# Allegro board REF_038XS-SI6D5018Q-A100.brd

Outline 581.66 x 429.26 mm; copper layers: TOP, L02_GND, L03_DPS, L04_GND, L05_DPS, L06_GND, L07_DPS, L08_GND, L09_DPS, L10_GND, L11_DPS, L12_GND, L13_SIGNAL, L14_GND, L15_SIGNAL, L16_GND, L17_SIGNAL, L18_GND, L19_SIGNAL, L20_GND, L21_SIGNAL, L22_GND, L23_SIGNAL, L24_GND, L25_SIGNAL, L26_GND, L27_SIGNAL, L28_GND, L29_SIGNAL, L30_GND, L31_SIGNAL, L32_GND, L33_SIGNAL, L34_GND, L35_DPS, L36_UDB, L37_GND, BOTTOM. Coordinates in mm from the lower left corner of the outline.

## Design rules (mm)
net group D231_MCB1_E: nets D231_MCB1_E+ D231_MCB1_E-
net group D231_MCB1_EE: nets D231_MCB1_EE+ D231_MCB1_EE-
net group D231_MCB1_F: nets D231_MCB1_F+ D231_MCB1_F-
net group D231_MCB1_FF: nets D231_MCB1_FF+ D231_MCB1_FF-
net group D231_MCB1_G: nets D231_MCB1_G+ D231_MCB1_G-
net group D231_MCB1_GG: nets D231_MCB1_GG+ D231_MCB1_GG-
net group D231_MCB1_H: nets D231_MCB1_H+ D231_MCB1_H-
net group D231_MCB1_HH: nets D231_MCB1_HH+ D231_MCB1_HH-
net group D232_MCB1_E: nets D232_MCB1_E+ D232_MCB1_E-
net group D232_MCB1_EE: nets D232_MCB1_EE+ D232_MCB1_EE-
net group D232_MCB1_F: nets D232_MCB1_F+ D232_MCB1_F-
net group D232_MCB1_FF: nets D232_MCB1_FF+ D232_MCB1_FF-
net group D232_MCB1_G: nets D232_MCB1_G+ D232_MCB1_G-
net group D232_MCB1_GG: nets D232_MCB1_GG+ D232_MCB1_GG-
net group D232_MCB1_H: nets D232_MCB1_H+ D232_MCB1_H-
net group D232_MCB1_HH: nets D232_MCB1_HH+ D232_MCB1_HH-
net group D431_MCB1_AA: nets D431_MCB1_AA+ D431_MCB1_AA-
net group D431_MCB1_BB: nets D431_MCB1_BB+ D431_MCB1_BB-
net group D431_MCB1_CC: nets D431_MCB1_CC+ D431_MCB1_CC-
net group D431_MCB1_DD: nets D431_MCB1_DD+ D431_MCB1_DD-
net group D432_MCB1_A: nets D432_MCB1_A+ D432_MCB1_A-
net group D432_MCB1_AA: nets D432_MCB1_AA+ D432_MCB1_AA-
net group D432_MCB1_B: nets D432_MCB1_B+ D432_MCB1_B-
net group D432_MCB1_BB: nets D432_MCB1_BB+ D432_MCB1_BB-
net group D432_MCB1_C: nets D432_MCB1_C+ D432_MCB1_C-
net group D432_MCB1_CC: nets D432_MCB1_CC+ D432_MCB1_CC-
net group D432_MCB1_D: nets D432_MCB1_D+ D432_MCB1_D-
net group D432_MCB1_DD: nets D432_MCB1_DD+ D432_MCB1_DD-
net group DIFFPAIR900: nets D21401 D21403
net group DIFFPAIR904: nets D10601 D10603
net group AWG: nets S1_AWG_2SHARE+ S1_AWG_2SHARE- S2_AWG_2SHARE+ S2_AWG_2SHARE- S3_AWG_2SHARE+ S3_AWG_2SHARE- S4_AWG_2SHARE+ S4_AWG_2SHARE- S5_AWG_2SHARE+ S5_AWG_2SHARE- S6_AWG_2SHARE+ S6_AWG_2SHARE- S7_AWG_2SHARE+ S7_AWG_2SHARE- S8_AWG_2SHARE+ S8_AWG_2SHARE-
net group ETH-1: nets D10907 D10909 D10912 D10914 D11307 D11309 D11312 D11314 D11708 D11710 D11711 D11713 D12108 D12110 D12111 D12113
net group ETH-2: nets D10905 D10910 D10911 D10916 D11305 D11310 D11311 D11316 D11706 D11709 D11712 D11715 D12106 D12109 D12112 D12115
net group ETH-3: nets D10906 D10908 D10913 D10915 D11306 D11308 D11313 D11315 D11705 D11707 D11714 D11716 D12105 D12107 D12114 D12116
net group MIPI1: nets D21601 D21603 D21901 D21903 D22109 D22111
net group MIPI2: nets D21602 D21604 D21902 D21904 D22110 D22112
net group MIPI3: nets D21605 D21607 D21905 D21907 D22113 D22115
net group MIPI4: nets D21606 D21608 D21906 D21908 D22114 D22116
net group MIPI5: nets D10801 D10803 D12009 D12011 D12901 D12903
net group MIPI6: nets D10802 D10804 D12010 D12012 D12902 D12904
net group MIPI7: nets D10805 D10807 D12013 D12015 D12905 D12907
net group MIPI8: nets D10806 D10808 D12014 D12016 D12906 D12908
net group MIPI SWITCH: nets S1_OUT_RX0_CH0_ABC_CASE+ S1_OUT_RX0_CH0_ABC_CASE- S1_OUT_RX0_CH1_ABC_CASE+ S1_OUT_RX0_CH1_ABC_CASE- S1_OUT_RX0_CH2_ABC_CASE+ S1_OUT_RX0_CH2_ABC_CASE-
net group MIPI SWITCH1: nets S2_OUT_RX0_CH0_ABC_CASE+ S2_OUT_RX0_CH0_ABC_CASE- S2_OUT_RX0_CH1_ABC_CASE+ S2_OUT_RX0_CH1_ABC_CASE- S2_OUT_RX0_CH2_ABC_CASE+ S2_OUT_RX0_CH2_ABC_CASE- S3_OUT_RX0_CH0_ABC_CASE+ S3_OUT_RX0_CH0_ABC_CASE- S3_OUT_RX0_CH1_ABC_CASE+ S3_OUT_RX0_CH1_ABC_CASE- S3_OUT_RX0_CH2_ABC_CASE+ S3_OUT_RX0_CH2_ABC_CASE- S4_OUT_RX0_CH0_ABC_CASE+ S4_OUT_RX0_CH0_ABC_CASE- S4_OUT_RX0_CH1_ABC_CASE+ S4_OUT_RX0_CH1_ABC_CASE- S4_OUT_RX0_CH2_ABC_CASE+ S4_OUT_RX0_CH2_ABC_CASE- S5_OUT_RX0_CH0_ABC_CASE+ S5_OUT_RX0_CH0_ABC_CASE- S5_OUT_RX0_CH1_ABC_CASE+ S5_OUT_RX0_CH1_ABC_CASE- S5_OUT_RX0_CH2_ABC_CASE+ S5_OUT_RX0_CH2_ABC_CASE- S6_OUT_RX0_CH0_ABC_CASE+ S6_OUT_RX0_CH0_ABC_CASE- S6_OUT_RX0_CH1_ABC_CASE+ S6_OUT_RX0_CH1_ABC_CASE- S6_OUT_RX0_CH2_ABC_CASE+ S6_OUT_RX0_CH2_ABC_CASE- S7_OUT_RX0_CH0_ABC_CASE+ S7_OUT_RX0_CH0_ABC_CASE- S7_OUT_RX0_CH1_ABC_CASE+ S7_OUT_RX0_CH1_ABC_CASE- S7_OUT_RX0_CH2_ABC_CASE+ S7_OUT_RX0_CH2_ABC_CASE- S8_OUT_RX0_CH0_ABC_CASE+ S8_OUT_RX0_CH0_ABC_CASE- S8_OUT_RX0_CH1_ABC_CASE+ S8_OUT_RX0_CH1_ABC_CASE- S8_OUT_RX0_CH2_ABC_CASE+ S8_OUT_RX0_CH2_ABC_CASE-

## Placement (name value [footprint] x y rotation side)
2SA1  SHORT  [DEFAULT_SHORT_SMALL]  265.71 251.64 180 top
2SA2  SHORT  [DEFAULT_SHORT_SMALL]  265.71 252.15 180 top
2SA7  SHORT  [DEFAULT_SHORT_SMALL]  264.03 245.86 90 top
2SA8  SHORT  [DEFAULT_SHORT_SMALL]  265.3 245.86 90 top
2SA9  SHORT  [DEFAULT_SHORT_SMALL]  266.07 238 180 top
2SA10  SHORT  [DEFAULT_SHORT_SMALL]  266.07 237.49 180 top
2SA15  SHORT  [DEFAULT_SHORT_SMALL]  277.49 250.16 90 top
2SA16  SHORT  [DEFAULT_SHORT_SMALL]  276.98 250.16 90 top
2SA17  SHORT  [DEFAULT_SHORT_SMALL]  273.21 238.53 0 top
2SA18  SHORT  [DEFAULT_SHORT_SMALL]  273.21 237.92 0 top
2SA19  SHORT  [DEFAULT_SHORT_SMALL]  264.08 243.68 270 top
2SA20  SHORT  [DEFAULT_SHORT_SMALL]  263.49 243.68 270 top
2SA21  SHORT  [DEFAULT_SHORT_SMALL]  279.27 250.18 90 top
2SA22  SHORT  [DEFAULT_SHORT_SMALL]  280.54 250.2 90 top
2SA23  SHORT  [DEFAULT_SHORT_SMALL]  273.41 237.52 270 top
2SA24  SHORT  [DEFAULT_SHORT_SMALL]  274.06 237.52 270 top
3SA1  SHORT  [DEFAULT_SHORT_SMALL]  305.71 251.64 180 top
3SA2  SHORT  [DEFAULT_SHORT_SMALL]  305.71 252.15 180 top
3SA7  SHORT  [DEFAULT_SHORT_SMALL]  304.03 245.86 90 top
3SA8  SHORT  [DEFAULT_SHORT_SMALL]  305.3 245.86 90 top
3SA9  SHORT  [DEFAULT_SHORT_SMALL]  306.07 238 180 top
3SA10  SHORT  [DEFAULT_SHORT_SMALL]  306.07 237.49 180 top
3SA15  SHORT  [DEFAULT_SHORT_SMALL]  317.49 250.16 90 top
3SA16  SHORT  [DEFAULT_SHORT_SMALL]  316.98 250.16 90 top
3SA17  SHORT  [DEFAULT_SHORT_SMALL]  313.21 238.53 0 top
3SA18  SHORT  [DEFAULT_SHORT_SMALL]  313.21 237.92 0 top
3SA19  SHORT  [DEFAULT_SHORT_SMALL]  304.08 243.68 270 top
3SA20  SHORT  [DEFAULT_SHORT_SMALL]  303.49 243.68 270 top
3SA21  SHORT  [DEFAULT_SHORT_SMALL]  319.27 250.18 90 top
3SA22  SHORT  [DEFAULT_SHORT_SMALL]  320.54 250.2 90 top
3SA23  SHORT  [DEFAULT_SHORT_SMALL]  313.41 237.52 270 top
3SA24  SHORT  [DEFAULT_SHORT_SMALL]  314.06 237.52 270 top
4SA1  SHORT  [DEFAULT_SHORT_SMALL]  345.71 251.64 180 top
4SA2  SHORT  [DEFAULT_SHORT_SMALL]  345.71 252.15 180 top
4SA7  SHORT  [DEFAULT_SHORT_SMALL]  344.03 245.86 90 top
4SA8  SHORT  [DEFAULT_SHORT_SMALL]  345.3 245.86 90 top
4SA9  SHORT  [DEFAULT_SHORT_SMALL]  346.07 238 180 top
4SA10  SHORT  [DEFAULT_SHORT_SMALL]  346.07 237.49 180 top
4SA15  SHORT  [DEFAULT_SHORT_SMALL]  357.49 250.16 90 top
4SA16  SHORT  [DEFAULT_SHORT_SMALL]  356.98 250.16 90 top
4SA17  SHORT  [DEFAULT_SHORT_SMALL]  353.21 238.53 0 top
4SA18  SHORT  [DEFAULT_SHORT_SMALL]  353.21 237.92 0 top
4SA19  SHORT  [DEFAULT_SHORT_SMALL]  344.08 243.68 270 top
4SA20  SHORT  [DEFAULT_SHORT_SMALL]  343.49 243.68 270 top
4SA21  SHORT  [DEFAULT_SHORT_SMALL]  359.27 250.18 90 top
4SA22  SHORT  [DEFAULT_SHORT_SMALL]  360.54 250.2 90 top
4SA23  SHORT  [DEFAULT_SHORT_SMALL]  353.41 237.52 270 top
4SA24  SHORT  [DEFAULT_SHORT_SMALL]  354.06 237.52 270 top
5SA1  SHORT  [DEFAULT_SHORT_SMALL]  236.06 191.36 0 top
5SA2  SHORT  [DEFAULT_SHORT_SMALL]  236.06 191.87 0 top
5SA7  SHORT  [DEFAULT_SHORT_SMALL]  223.4 185.16 90 top
5SA8  SHORT  [DEFAULT_SHORT_SMALL]  223.91 185.16 90 top
5SA9  SHORT  [DEFAULT_SHORT_SMALL]  234.24 174.5 270 top
5SA10  SHORT  [DEFAULT_SHORT_SMALL]  235.03 174.5 270 top
5SA15  SHORT  [DEFAULT_SHORT_SMALL]  239.49 193.83 90 top
5SA16  SHORT  [DEFAULT_SHORT_SMALL]  238.98 193.83 90 top
5SA17  SHORT  [DEFAULT_SHORT_SMALL]  235.98 191.77 0 top
5SA18  SHORT  [DEFAULT_SHORT_SMALL]  235.98 192.46 0 top
5SA19  SHORT  [DEFAULT_SHORT_SMALL]  224.08 183.68 270 top
5SA20  SHORT  [DEFAULT_SHORT_SMALL]  223.49 183.68 270 top
5SA21  SHORT  [DEFAULT_SHORT_SMALL]  234.54 193.95 0 top
5SA22  SHORT  [DEFAULT_SHORT_SMALL]  234.54 195.43 0 top
5SA23  SHORT  [DEFAULT_SHORT_SMALL]  233.04 174.51 270 top
5SA24  SHORT  [DEFAULT_SHORT_SMALL]  234.32 174.51 270 top
6SA1  SHORT  [DEFAULT_SHORT_SMALL]  276.06 191.36 0 top
6SA2  SHORT  [DEFAULT_SHORT_SMALL]  276.06 191.87 0 top
6SA7  SHORT  [DEFAULT_SHORT_SMALL]  263.4 185.16 90 top
6SA8  SHORT  [DEFAULT_SHORT_SMALL]  263.91 185.16 90 top
6SA9  SHORT  [DEFAULT_SHORT_SMALL]  274.24 174.5 270 top
6SA10  SHORT  [DEFAULT_SHORT_SMALL]  275.03 174.5 270 top
6SA15  SHORT  [DEFAULT_SHORT_SMALL]  279.49 193.83 90 top
6SA16  SHORT  [DEFAULT_SHORT_SMALL]  278.98 193.83 90 top
6SA17  SHORT  [DEFAULT_SHORT_SMALL]  275.98 191.77 0 top
6SA18  SHORT  [DEFAULT_SHORT_SMALL]  275.98 192.46 0 top
6SA19  SHORT  [DEFAULT_SHORT_SMALL]  264.08 183.68 270 top
6SA20  SHORT  [DEFAULT_SHORT_SMALL]  263.49 183.68 270 top
6SA21  SHORT  [DEFAULT_SHORT_SMALL]  274.54 193.95 0 top
6SA22  SHORT  [DEFAULT_SHORT_SMALL]  274.54 195.43 0 top
6SA23  SHORT  [DEFAULT_SHORT_SMALL]  273.04 174.51 270 top
6SA24  SHORT  [DEFAULT_SHORT_SMALL]  274.32 174.51 270 top
7SA1  SHORT  [DEFAULT_SHORT_SMALL]  316.06 191.36 0 top
7SA2  SHORT  [DEFAULT_SHORT_SMALL]  316.06 191.87 0 top
7SA7  SHORT  [DEFAULT_SHORT_SMALL]  303.4 185.16 90 top
7SA8  SHORT  [DEFAULT_SHORT_SMALL]  303.91 185.16 90 top
7SA9  SHORT  [DEFAULT_SHORT_SMALL]  314.24 174.5 270 top
7SA10  SHORT  [DEFAULT_SHORT_SMALL]  315.03 174.5 270 top
7SA15  SHORT  [DEFAULT_SHORT_SMALL]  319.49 193.83 90 top
7SA16  SHORT  [DEFAULT_SHORT_SMALL]  318.98 193.83 90 top
7SA17  SHORT  [DEFAULT_SHORT_SMALL]  315.98 191.77 0 top
7SA18  SHORT  [DEFAULT_SHORT_SMALL]  315.98 192.46 0 top
7SA19  SHORT  [DEFAULT_SHORT_SMALL]  304.08 183.68 270 top
7SA20  SHORT  [DEFAULT_SHORT_SMALL]  303.49 183.68 270 top
7SA21  SHORT  [DEFAULT_SHORT_SMALL]  314.54 193.95 0 top
7SA22  SHORT  [DEFAULT_SHORT_SMALL]  314.54 195.43 0 top
7SA23  SHORT  [DEFAULT_SHORT_SMALL]  313.04 174.51 270 top
7SA24  SHORT  [DEFAULT_SHORT_SMALL]  314.32 174.51 270 top
8SA1  SHORT  [DEFAULT_SHORT_SMALL]  356.06 191.36 0 top
8SA2  SHORT  [DEFAULT_SHORT_SMALL]  356.06 191.87 0 top
8SA7  SHORT  [DEFAULT_SHORT_SMALL]  343.4 185.16 90 top
8SA8  SHORT  [DEFAULT_SHORT_SMALL]  343.91 185.16 90 top
8SA9  SHORT  [DEFAULT_SHORT_SMALL]  354.24 174.5 270 top
8SA10  SHORT  [DEFAULT_SHORT_SMALL]  355.03 174.5 270 top
8SA15  SHORT  [DEFAULT_SHORT_SMALL]  359.49 193.83 90 top
8SA16  SHORT  [DEFAULT_SHORT_SMALL]  358.98 193.83 90 top
8SA17  SHORT  [DEFAULT_SHORT_SMALL]  355.98 191.77 0 top
8SA18  SHORT  [DEFAULT_SHORT_SMALL]  355.98 192.46 0 top
8SA19  SHORT  [DEFAULT_SHORT_SMALL]  344.08 183.68 270 top
8SA20  SHORT  [DEFAULT_SHORT_SMALL]  343.49 183.68 270 top
8SA21  SHORT  [DEFAULT_SHORT_SMALL]  354.54 193.95 0 top
8SA22  SHORT  [DEFAULT_SHORT_SMALL]  354.54 195.43 0 top
8SA23  SHORT  [DEFAULT_SHORT_SMALL]  353.04 174.51 270 top
8SA24  SHORT  [DEFAULT_SHORT_SMALL]  354.32 174.51 270 top
BD5  BD120-1.5A-S4-MU  [FB0402]  543.47 239.79 270 bottom
BD9  BD120-1.5A-S4-MU  [FB0402]  224.66 243.83 270 bottom
BD21  BD120-1.5A-S4-MU  [FB0402]  222.95 232.36 0 bottom
BD1721  BD120-1.5A-S4-MU  [FB0402]  543.47 226.84 270 bottom
BD1722  BD120-1.5A-S4-MU  [FB0402]  543.09 213.5 270 bottom
BD1723  BD120-1.5A-S4-MU  [FB0402]  543.09 199.41 270 bottom
BD1728  BD120-1.5A-S4-MU  [FB0402]  229.83 271.82 270 bottom
BD1729  BD120-1.5A-S4-MU  [FB0402]  236.97 270.94 270 bottom
BDB5  BD120-1.5A-S4-MU  [FB0402]  211.03 246.46 0 bottom
BDB6  BD120-1.5A-S4-MU  [FB0402]  211.03 234.89 0 bottom
BGA234-11X11-P0.65  REF-CODE-SOCKET  [SOCKET_CODE]  3.67 430.51 0 top
C262  0.1U-16-X7S-S2-MU  [C0201]  224.41 232.06 270 bottom
C264  NC/10U-16-X7R-S8-SS  [C0805]  227.48 269.95 90 bottom
C267  33P-50-N-S2-MU  [C0201]  236.23 224.18 270 bottom
C268  33P-50-N-S2-MU  [C0201]  235.23 224.18 270 bottom
C270  NC/10U-16-X7R-S8-SS  [C0805]  224.95 259 0 bottom
C271  12P-50-N-S4-MU  [C0402]  232.95 267.19 180 bottom
C272  12P-50-N-S4-MU  [C0402]  230.93 267.19 0 bottom
C278  1U-10-X7S-S4-TDK  [C0402]  232.87 289.3 0 bottom
C279  1U-10-X7S-S4-TDK  [C0402]  232.87 288.11 0 bottom
C280  0.1U-16-X-S4-MU  [C0402]  232.87 286.91 0 bottom
C281  0.1U-16-X-S4-MU  [C0402]  232.87 285.72 0 bottom
C282  1U-10-X7S-S4-TDK  [C0402]  238.7 282.67 270 bottom
C283  0.1U-16-X-S4-MU  [C0402]  237.54 282.67 270 bottom
C284  1U-10-X7S-S4-TDK  [C0402]  237.62 294.04 90 bottom
C285  0.1U-16-X-S4-MU  [C0402]  238.81 294.04 90 bottom
C286  0.1U-16-X-S4-MU  [C0402]  233.82 293.54 180 bottom
C288  1000P-50-X7R-S2-MU  [C0201]  233.49 291.76 270 bottom
C289  0.1U-16-X-S4-MU  [C0402]  231.21 291 270 bottom
C290  NC/0.1U-16-X7R-S4-TY  [C0402]  224.35 292.22 180 bottom
C298  0.1U-16-X7S-S2-MU  [C0201]  222.95 288.84 90 bottom
C299  0.1U-16-X7S-S2-MU  [C0201]  220.02 293.16 180 bottom
C300  0.1U-16-X-S4-MU  [C0402]  220.67 287.06 270 bottom
C301  1U-10-X7S-S4-TDK  [C0402]  219.51 287.06 270 bottom
C302  10P-50-N-S2-MU  [C0201]  214.98 243.61 0 bottom
C309  10P-50-N-S2-MU  [C0201]  214.98 255.18 0 bottom
C310  10P-50-N-S2-MU  [C0201]  213.69 255.18 180 bottom
C318  10P-50-N-S2-MU  [C0201]  211.94 255.18 0 bottom
C320  10P-50-N-S2-MU  [C0201]  213.69 243.61 180 bottom
C332  2.2U-16-X7R-S6-TY  [C0603]  109.1 226.65 270 bottom
C333  0.1U-16-X-S4-MU  [C0402]  107.7 226.83 270 bottom
C334  10U-16-X7R-S8-SS  [C0805]  100.08 226.53 90 bottom
C335  0.1U-16-X-S4-MU  [C0402]  101.74 226.35 90 bottom
C336  4.7U-25-X7R-S8-TY  [C0805]  87.58 240.29 270 bottom
C337  0.1U-16-X-S4-MU  [C0402]  87.6 237.74 180 bottom
C338  4.7U-25-X7R-S8-TY  [C0805]  106 240.29 270 bottom
C339  0.1U-16-X-S4-MU  [C0402]  106.03 237.74 180 bottom
C400  2.2U-10-X-S4-MU  [C0402]  540.94 239.82 90 bottom
C401  0.1U-16-X-S4-MU  [C0402]  542.2 239.82 90 bottom
C402  4.7U-6.3-X-S4-MU  [C0402]  523.51 152.12 0 bottom
C403  22U-16-X5R-SA-SS  [C1206]  520.12 149.58 90 bottom
C404  10U-25-X-S6-MU  [C0603]  519.86 146.58 180 bottom
C405  1U-10-X7S-S4-TDK  [C0402]  520.37 145.26 180 bottom
C406  0.1U-16-X-S4-MU  [C0402]  90.42 287.53 180 bottom
C407  2.2U-10-X-S4-MU  [C0402]  82.6 288.09 270 bottom
C408  0.1U-16-X-S4-MU  [C0402]  83.74 288.09 270 bottom
C409  0.1U-16-X-S4-MU  [C0402]  73.71 296.14 0 bottom
C410  0.1U-16-X-S4-MU  [C0402]  503.58 221.92 270 bottom
C411  0.1U-16-X-S4-MU  [C0402]  493.55 229.97 0 bottom
C412  2.2U-10-X-S4-MU  [C0402]  502.43 221.92 270 bottom
C413  0.1U-16-X-S4-MU  [C0402]  510.25 221.35 180 bottom
C415  0.1U-16-X-S4-MU  [C0402]  90.42 273.81 180 bottom
C416  2.2U-10-X-S4-MU  [C0402]  82.6 274.38 270 bottom
C417  0.1U-16-X-S4-MU  [C0402]  73.71 282.43 0 bottom
C475  4.7U-6.3-X-S4-MU  [C0402]  225.86 265.11 270 bottom
C476  1U-10-X7S-S4-TDK  [C0402]  219 268.25 90 bottom
C477  10U-25-X-S6-MU  [C0603]  220.32 268.76 90 bottom
C478  22U-16-X5R-SA-SS  [C1206]  223.32 268.5 0 bottom
C894  0.1U-16-X-S4-MU  [C0402]  542.2 226.87 90 bottom
C895  2.2U-10-X-S4-MU  [C0402]  540.94 226.87 90 bottom
C910  0.1U-16-X-S4-MU  [C0402]  83.74 274.38 270 bottom
C922  0.1U-16-X-S4-MU  [C0402]  213.16 246.46 0 bottom
C923  0.1U-16-X-S4-MU  [C0402]  213.16 234.89 0 bottom
C924  10P-50-N-S2-MU  [C0201]  211.94 243.61 0 bottom
C955  0.1U-16-X-S4-MU  [C0402]  90.42 260.1 180 bottom
C956  2.2U-10-X-S4-MU  [C0402]  82.6 260.66 270 bottom
C957  0.1U-16-X-S4-MU  [C0402]  73.71 268.71 0 bottom
C958  0.1U-16-X-S4-MU  [C0402]  83.74 260.66 270 bottom
C983  0.1U-16-X-S4-MU  [C0402]  541.82 213.53 90 bottom
C984  2.2U-10-X-S4-MU  [C0402]  540.55 213.53 90 bottom
C985  0.1U-16-X-S4-MU  [C0402]  541.82 199.44 90 bottom
C986  2.2U-10-X-S4-MU  [C0402]  540.55 199.44 90 bottom
C1066  0.01U-10-X7R-S2-YA  [C0201]  244.98 274.19 0 bottom
C1067  0.01U-10-X7R-S2-YA  [C0201]  246.33 274.19 180 bottom
C1074  0.1U-16-X7S-S2-MU  [C0201_MINI]  229.58 270.27 180 bottom
C1077  0.1U-16-X7S-S2-MU  [C0201_MINI]  236.72 269.49 180 bottom
C1080  0.1U-16-X7S-S2-MU  [C0201_MINI]  242.99 269.49 180 bottom
C1081  0.1U-16-X7S-S2-MU  [C0201_MINI]  243.8 273.3 180 bottom
C1082  0.1U-16-X-S4-MU  [C0402]  503.58 203.76 270 bottom
C1083  0.1U-16-X-S4-MU  [C0402]  248.15 224.79 0 bottom
C1085  2.2U-10-X-S4-MU  [C0402]  493.55 211.81 0 bottom
CA1  0.1U-16-X-S4-MU  [C0402]  205.72 237.49 0 bottom
CA2  10U-25-X7R-SA  [C1206]  205.72 240.03 0 bottom
CA7  10U-25-X7R-SA  [C1206]  245.12 281.69 0 bottom
CA8  0.1U-16-X-S4-MU  [C0402]  245.12 279.65 0 bottom
CA19  470U-25-E-S10.4X10.4  [EC_10P3X10_S]  189.66 230.89 90 bottom
CA20  10U-25-X7R-SA  [C1206]  216.67 281.69 0 bottom
CA21  0.1U-16-X-S4-MU  [C0402]  216.67 279.65 0 bottom
CA22  10U-25-X7R-SA  [C1206]  222.76 277.62 0 bottom
CA23  0.1U-16-X-S4-MU  [C0402]  222.76 275.59 0 bottom
CA24  10U-25-X7R-SA  [C1206]  216.67 277.62 0 bottom
CA25  0.1U-16-X-S4-MU  [C0402]  216.67 275.59 0 bottom
CA26  10U-25-X7R-SA  [C1206]  235.18 277.62 0 bottom
CA27  0.1U-16-X-S4-MU  [C0402]  235.18 275.59 0 bottom
CA34  10U-25-X7R-SA  [C1206]  245.12 277.62 0 bottom
CA35  0.1U-16-X-S4-MU  [C0402]  245.12 275.59 0 bottom
CA36  0.1U-16-X-S4-MU  [C0402]  228.85 275.59 0 bottom
CA37  10U-25-X7R-SA  [C1206]  228.85 277.62 0 bottom
CB1  0.1U-25-X-S6  [C0603]  416.81 133.35 0 bottom
CB2  10U-25-X7R-SA  [C1206]  416.81 130.81 0 bottom
CB3  0.1U-25-X-S6  [C0603]  560.07 133.35 0 bottom
CB4  10U-25-X7R-SA  [C1206]  560.07 130.81 0 bottom
CB5  0.1U-25-X-S6  [C0603]  560.07 295.91 180 bottom
CB6  10U-25-X7R-SA  [C1206]  560.07 298.45 180 bottom
CB7  0.1U-25-X-S6  [C0603]  424.16 290.83 180 bottom
CB8  10U-25-X7R-SA  [C1206]  424.16 293.37 180 bottom
CB9  0.1U-25-X-S6  [C0603]  164.85 133.35 0 bottom
CB10  10U-25-X7R-SA  [C1206]  164.85 130.81 0 bottom
CB11  0.1U-25-X-S6  [C0603]  157.46 290.83 180 bottom
CB12  10U-25-X7R-SA  [C1206]  157.46 293.37 180 bottom
CB13  0.1U-25-X-S6  [C0603]  21.59 133.35 0 bottom
CB14  10U-25-X7R-SA  [C1206]  21.59 130.81 0 bottom
CB15  0.1U-25-X-S6  [C0603]  21.59 295.91 180 bottom
CB16  10U-25-X7R-SA  [C1206]  21.59 298.45 180 bottom
CC1  0.1U-16-X7S-S2-MU  [C0201]  230.19 246.91 180 bottom
CC2  0.1U-16-X7S-S2-MU  [C0201]  230.5 250.48 90 bottom
CC3  0.1U-16-X7S-S2-MU  [C0201]  228.87 245.61 180 bottom
CC4  0.1U-16-X7S-S2-MU  [C0201]  230.19 246.26 180 bottom
CC5  0.1U-16-X7S-S2-MU  [C0201]  231.16 246.56 90 bottom
CC6  0.1U-16-X7S-S2-MU  [C0201]  228.87 244.96 180 bottom
CC7  0.1U-16-X7S-S2-MU  [C0201]  232.14 244.96 0 bottom
CC8  0.1U-16-X7S-S2-MU  [C0201]  230.5 243.97 270 bottom
CC9  0.1U-16-X7S-S2-MU  [C0201]  231.16 243.97 270 bottom
CC12  0.1U-16-X7S-S2-MU  [C0201]  229.86 244.62 270 bottom
CC13  0.1U-16-X7S-S2-MU  [C0201]  228.24 241.05 180 bottom
CC14  0.1U-16-X7S-S2-MU  [C0201]  231.46 245.61 0 bottom
CC15  0.1U-16-X7S-S2-MU  [C0201]  230.19 245.61 180 bottom
CC16  0.1U-16-X7S-S2-MU  [C0201]  230.84 244.96 180 bottom
CC70  0.1U-16-X7S-S2-MU  [C0201]  232.46 242.67 270 bottom
CC71  0.1U-16-X7S-S2-MU  [C0201]  235.38 243 0 bottom
CC73  0.1U-16-X7S-S2-MU  [C0201]  227.91 242.68 90 bottom
CC84  0.1U-16-X7S-S2-MU  [C0201]  233.11 250.48 90 bottom
CC85  0.1U-16-X7S-S2-MU  [C0201]  231.15 250.48 90 bottom
CC86  0.1U-16-X7S-S2-MU  [C0201]  232.46 250.48 90 bottom
CC87  0.1U-16-X7S-S2-MU  [C0201]  232.14 246.26 180 bottom
CC88  0.1U-16-X7S-S2-MU  [C0201]  233.11 244 270 bottom
CC89  0.1U-16-X7S-S2-MU  [C0201]  227.91 244.66 270 bottom
CC90  0.1U-16-X7S-S2-MU  [C0201]  231.8 250.48 90 bottom
CC91  0.1U-16-X7S-S2-MU  [C0201]  234.06 243.65 0 bottom
CC92  0.1U-16-X7S-S2-MU  [C0201]  232.45 244 270 bottom
CC96  0.1U-16-X7S-S2-MU  [C0201]  231.51 247.56 180 bottom
CC101  0.1U-16-X7S-S2-MU  [C0201]  230.84 240.4 0 bottom
CC103  0.1U-16-X7S-S2-MU  [C0201]  231.81 242.02 90 bottom
CC105  0.1U-16-X7S-S2-MU  [C0201]  232.46 240.72 270 bottom
CC107  0.1U-16-X7S-S2-MU  [C0201]  232.76 241.7 0 bottom
CC112  0.1U-16-X7S-S2-MU  [C0201]  235.06 250.48 90 bottom
CC130  0.1U-16-X7S-S2-MU  [C0201]  228.24 241.7 180 bottom
CC133  1U-6.3-X7T-S2-MU  [C0201]  227.26 238.78 270 bottom
CC134  NC/0.1U-10-X7R-S2-MU  [C0201]  227.91 238.78 270 bottom
CC182  0.1U-16-X7S-S2-MU  [C0201]  226.61 250.48 90 bottom
CC194  0.1U-16-X7S-S2-MU  [C0201]  231.49 243 180 bottom
CC202  0.1U-16-X7S-S2-MU  [C0201]  226.28 245.61 180 bottom
CC203  0.1U-16-X7S-S2-MU  [C0201]  229.86 239.42 270 bottom
CC204  0.1U-16-X7S-S2-MU  [C0201]  230.51 239.42 270 bottom
CC205  0.1U-16-X7S-S2-MU  [C0201]  231.16 239.42 270 bottom
CC208  0.1U-16-X7S-S2-MU  [C0201]  227.57 246.26 180 bottom
CC209  0.1U-16-X7S-S2-MU  [C0201]  228.23 247.56 180 bottom
CC210  0.1U-16-X7S-S2-MU  [C0201]  229.53 240.41 180 bottom
CC211  0.1U-16-X7S-S2-MU  [C0201]  230.5 242.02 90 bottom
CC212  0.1U-16-X7S-S2-MU  [C0201]  229.53 241.06 180 bottom
CC213  0.1U-16-X7S-S2-MU  [C0201]  231.16 242.02 90 bottom
CC215  0.1U-16-X7S-S2-MU  [C0201]  231.81 239.42 90 bottom
CC216  0.1U-16-X7S-S2-MU  [C0201]  228.56 238.78 270 bottom
CD1  0.1U-16-X7S-S2-MU  [C0201]  295.73 296.3 90 top
CD2  0.1U-16-X7S-S2-MU  [C0201]  465.17 278.08 90 top
CON1  MS-PWR-CONN-30P-V3-SI6D70  [CONN_15X2_100MIL_PH_MS_V2]  24.74 150.36 90 top
CSDPS303  V93K_CSDPS_DPS32  [PG_VG93K_PF_DPS32_G1D303]  327.66 46.99 0 top
CSDPS307  V93K_CSDPS_DPS32  [PG_VG93K_PF_DPS32_G1D307]  401.32 46.99 0 top
CSDPS310  V93K_CSDPS_DPS32  [PG_VG93K_PF_DPS32_G2D310]  401.32 361.95 0 top
CSDPS314  V93K_CSDPS_DPS32  [PG_VG93K_PF_DPS32_G2D314]  327.66 361.95 0 top
CSDPS319  V93K_CSDPS_DPS32  [PG_VG93K_PF_DPS32_G3D319]  180.34 46.99 0 top
CSDPS323  V93K_CSDPS_DPS32  [PG_VG93K_PF_DPS32_G3D323]  254 46.99 0 top
CSDPS426  V93K_CSDPS  [PG_VG93K_PF_DPS32_G8D426]  254 361.95 0 top
CSDPS430  V93K_CSDPS  [PG_VG93K_PF_DPS32_G8D430]  180.34 361.95 0 top
D101  V93K_CH  [PG_VG93K_F_G1D101]  327.66 97.79 0 top
D102  V93K_CH  [PG_VG93K_F_G1D102]  327.66 77.47 0 top
D103  V93K_CH  [PG_VG93K_F_G1D103]  327.66 57.15 0 top
D104  V93K_CH  [PG_VG93K_F_G1D104]  327.66 36.83 0 top
D105  V93K_CH  [PG_VG93K_F_G1D105]  401.32 97.79 0 top
D106  V93K_CH  [PG_VG93K_F_G1D106]  401.32 77.47 0 top
D107  V93K_CH  [PG_VG93K_F_G1D107]  401.32 57.15 0 top
D108  V93K_CH  [PG_VG93K_F_G1D108]  401.32 36.83 0 top
D109  V93K_CH  [PG_VG93K_F_G2D109]  401.32 331.47 0 top
D110  V93K_CH  [PG_VG93K_F_G2D110]  401.32 351.79 0 top
D111  V93K_CH  [PG_VG93K_F_G2D111]  401.32 372.11 0 top
D112  V93K_CH  [PG_VG93K_F_G2D112]  401.32 392.43 0 top
D113  V93K_CH  [PG_VG93K_F_G2D113]  327.66 331.47 0 top
D114  V93K_CH  [PG_VG93K_F_G2D114]  327.66 351.79 0 top
D115  V93K_CH  [PG_VG93K_F_G2D115]  327.66 372.11 0 top
D116  V93K_CH  [PG_VG93K_F_G2D116]  327.66 392.43 0 top
D117  V93K_CH  [PG_VG93K_F_G3D117]  180.34 97.79 0 top
D118  V93K_CH  [PG_VG93K_F_G3D118]  180.34 77.47 0 top
D119  V93K_CH  [PG_VG93K_F_G3D119]  180.34 57.15 0 top
D120  V93K_CH  [PG_VG93K_F_G3D120]  180.34 36.83 0 top
D121  V93K_CH  [PG_VG93K_F_G3D121]  254 97.79 0 top
D122  V93K_CH  [PG_VG93K_F_G3D122]  254 77.47 0 top
D123  V93K_CH  [PG_VG93K_F_G3D123]  254 57.15 0 top
D124  V93K_CH  [PG_VG93K_F_G3D124]  254 36.83 0 top
D125  V93K_CH  [PG_VG93K_F_G4D125]  33.02 97.79 0 top
D126  V93K_CH  [PG_VG93K_F_G4D126]  33.02 77.47 0 top
D127  V93K_CH  [PG_VG93K_F_G4D127]  33.02 57.15 0 top
D128  V93K_CH  [PG_VG93K_F_G4D128]  33.02 36.83 0 top
D129  V93K_CH  [PG_VG93K_F_G4D129]  106.68 97.79 0 top
D130  V93K_CH  [PG_VG93K_F_G4D130]  106.68 77.47 0 top
D131  V93K_CH  [PG_VG93K_F_G4D131]  106.68 57.15 0 top
D132  V93K_CH  [PG_VG93K_F_G4D132]  106.68 36.83 0 top
D201  V93K_CH  [PG_VG93K_F_G5D201]  474.98 97.79 0 top
D202  V93K_CH  [PG_VG93K_F_G5D202]  474.98 77.47 0 top
D203  V93K_CH  [PG_VG93K_F_G5D203]  474.98 57.15 0 top
D204  V93K_CH  [PG_VG93K_F_G5D204]  474.98 36.83 0 top
D205  V93K_CH  [PG_VG93K_F_G5D205]  548.64 97.79 0 top
D206  V93K_CH  [PG_VG93K_F_G5D206]  548.64 77.47 0 top
D207  V93K_CH  [PG_VG93K_F_G5D207]  548.64 57.15 0 top
D208  V93K_CH  [PG_VG93K_F_G5D208]  548.64 36.83 0 top
D209  V93K_CH  [PG_VG93K_F_G6D209]  548.64 331.47 0 top
D210  V93K_CH  [PG_VG93K_F_G6D210]  548.64 351.79 0 top
D211  V93K_CH  [PG_VG93K_F_G6D211]  548.64 372.11 0 top
D212  V93K_CH  [PG_VG93K_F_G6D212]  548.64 392.43 0 top
D213  V93K_CH  [PG_VG93K_F_G6D213]  474.98 331.47 0 top
D214  V93K_CH  [PG_VG93K_F_G6D214]  474.98 351.79 0 top
D215  V93K_CH  [PG_VG93K_F_G6D215]  474.98 372.11 0 top
D216  V93K_CH  [PG_VG93K_F_G6D216]  474.98 392.43 0 top
D217  V93K_CH  [PG_VG93K_F_G7D217]  106.68 331.47 0 top
D218  V93K_CH  [PG_VG93K_F_G7D218]  106.68 351.79 0 top
D219  V93K_CH  [PG_VG93K_F_G7D219]  106.68 372.11 0 top
D220  V93K_CH  [PG_VG93K_F_G7D220]  106.68 392.43 0 top
D221  V93K_CH  [PG_VG93K_F_G7D221]  33.02 331.47 0 top
D222  V93K_CH  [PG_VG93K_F_G7D222]  33.02 351.79 0 top
D223  V93K_CH  [PG_VG93K_F_G7D223]  33.02 372.11 0 top
D224  V93K_CH  [PG_VG93K_F_G7D224]  33.02 392.43 0 top
D225  V93K_CH_ND  [PG_VG93K_F_G8D225_ND]  254 331.47 0 top
D226/D626  V93K_PS1600 HD  [PG_VG93K_F_HSM_G8D226_626_ND]  254 351.79 0 top
D227  V93K_CH  [PG_VG93K_F_G8D227]  254 372.11 0 top
D228  V93K_CH  [PG_VG93K_F_G8D228]  254 392.43 0 top
D229  V93K_CH_ND  [PG_VG93K_F_G8D229_ND]  180.34 331.47 0 top
D230/D630  V93K_PS1600 HD  [PG_VG93K_F_HSM_G8D230_630_ND]  180.34 351.79 0 top
D231  V93K_CH  [PG_VG93K_F_G8D231]  180.34 372.11 0 top
D232  V93K_CH  [PG_VG93K_F_G8D232]  180.34 392.43 0 top
D325  V93K_CH  [PG_VG93K_F_G4D325]  33.02 87.63 0 top
D326  V93K_CH  [PG_VG93K_F_G4D326]  33.02 67.31 0 top
D327  V93K_CH  [PG_VG93K_F_G4D327]  33.02 46.99 0 top
D328  V93K_CH  [PG_VG93K_F_G4D328]  33.02 26.67 0 top
D329  V93K_CH  [PG_VG93K_F_G4D329]  106.68 87.63 0 top
D330  V93K_CH  [PG_VG93K_F_G4D330]  106.68 67.31 0 top
D331  V93K_CH  [PG_VG93K_F_G4D331]  106.68 46.99 0 top
D332  V93K_CH  [PG_VG93K_F_G4D332]  106.68 26.67 0 top
D409  V93K_CH  [PG_VG93K_F_G6D409]  548.64 341.63 0 top
D410  V93K_CH  [PG_VG93K_F_G6D410]  548.64 361.95 0 top
D411  V93K_CH  [PG_VG93K_F_G6D411]  548.64 382.27 0 top
D412  V93K_CH  [PG_VG93K_F_G6D412]  548.64 402.59 0 top
D413  V93K_CH  [PG_VG93K_F_G6D413]  474.98 341.63 0 top
D414  V93K_CH  [PG_VG93K_F_G6D414]  474.98 361.95 0 top
D415  V93K_CH  [PG_VG93K_F_G6D415]  474.98 382.27 0 top
D416  V93K_CH  [PG_VG93K_F_G6D416]  474.98 402.59 0 top
D417  V93K_CH  [PG_VG93K_F_G7D417]  106.68 341.63 0 top
D418  V93K_CH  [PG_VG93K_F_G7D418]  106.68 361.95 0 top
D419  V93K_CH  [PG_VG93K_F_G7D419]  106.68 382.27 0 top
D420  V93K_CH  [PG_VG93K_F_G7D420]  106.68 402.59 0 top
D421  V93K_CH  [PG_VG93K_F_G7D421]  33.02 341.63 0 top
D422  V93K_CH  [PG_VG93K_F_G7D422]  33.02 361.95 0 top
D423  V93K_CH  [PG_VG93K_F_G7D423]  33.02 382.27 0 top
D424  V93K_CH  [PG_VG93K_F_G7D424]  33.02 402.59 0 top
D425  V93K_CH_ND  [PG_VG93K_F_G8D425_ND]  254 341.63 0 top
D427  V93K_CH  [PG_VG93K_F_G8D427]  254 382.27 0 top
D428  V93K_CH  [PG_VG93K_F_G8D428]  254 402.59 0 top
D429  V93K_CH_ND  [PG_VG93K_F_G8D429_ND]  180.34 341.63 0 top
D431  V93K_CH  [PG_VG93K_F_G8D431]  180.34 382.27 0 top
D432  V93K_CH  [PG_VG93K_F_G8D432]  180.34 402.59 0 top
DPS1  V93K_DPS  [PG_VG93K_F_G1DPS1]  401.32 16.51 0 top
DPS2  V93K_DPS  [PG_VG93K_F_G2DPS2]  327.66 412.75 0 top
DPS3  V93K_DPS  [PG_VG93K_F_G3DPS3]  254 16.51 0 top
DPS8  V93K_DPS  [PG_VG93K_F_G8DPS8]  180.34 412.75 0 top
FD1  -  [FD_040_V2]  10.16 129.54 0 top
FD2  -  [FD_040_V2]  11.43 298.45 0 top
FD3  -  [FD_040_V2]  157.48 298.45 0 top
FD4  -  [FD_040_V2]  157.48 130.81 0 top
FD5  -  [FD_040_V2]  424.18 298.45 0 top
FD6  -  [FD_040_V2]  424.18 130.81 0 top
FD7  -  [FD_040_V2]  570.23 298.45 0 top
FD8  -  [FD_040_V2]  570.23 130.81 0 top
FD9  -  [FD_040_V2]  10.16 129.54 180 bottom
FD10  -  [FD_040_V2]  11.43 298.45 180 bottom
FD11  -  [FD_040_V2]  157.48 298.45 180 bottom
FD12  -  [FD_040_V2]  157.48 130.81 180 bottom
FD13  -  [FD_040_V2]  424.18 298.45 180 bottom
FD14  -  [FD_040_V2]  424.18 130.81 180 bottom
FD15  -  [FD_040_V2]  570.23 298.45 180 bottom
FD16  -  [FD_040_V2]  570.23 130.81 180 bottom
H1  M3-HOLE  [M3_NPTH169]  158.75 241.3 0 top
H2  M3-HOLE  [M3_NPTH169]  158.75 187.96 0 top
H3  M3-HOLE  [M3_NPTH169]  422.91 241.3 0 top
H4  M3-HOLE  [M3_NPTH169]  422.91 187.96 0 top
J1  HDR-2X1-M  [JP_2P_100]  10.78 152.9 180 top
J2  HDR-2X1-M  [JP_2P_100]  14.16 152.9 180 top
JP1  A2001WV0-4PS  [CONN_S4X1_2MM_JWT]  100.37 260.08 90 top
K2  UA2-5NJ-A-V3  [RL_NECUA2_5V_V3]  119.04 248.1 90 bottom
K3  UA2-5NJ-A-V3  [RL_NECUA2_5V_V3]  112.69 248.1 90 bottom
K4  UA2-5NJ-A-V3  [RL_NECUA2_5V_V3]  106.34 248.1 90 bottom
K5  UA2-5NJ-A-V3  [RL_NECUA2_5V_V3]  99.99 248.1 90 bottom
K6  UA2-5NJ-A-V3  [RL_NECUA2_5V_V3]  93.64 248.1 90 bottom
K7  UA2-5NJ-A-V3  [RL_NECUA2_5V_V3]  87.29 248.1 90 bottom
K29  G6K-2F-Y-5V-A  [RL_G6K2F-Y_5V_OMRON]  231.94 258.56 90 bottom
K32  G6K-2F-Y-5V-A  [RL_G6K2F-Y_5V_OMRON]  235.73 231.79 270 bottom
K34  G6K-2P-Y5VDC-A  [RL_OMRONG6K2PY_5V]  166.88 269.24 90 bottom
K39  UA2-5NE-A-V3  [RL_NECUA2_5V_V3]  224.66 224.54 180 bottom
K96  EC2-5NJ  [RL_NECEC2_10P_5V]  203.76 229.39 0 bottom
K107  G6K-2P-Y5VDC-A  [RL_OMRONG6K2PY_5V]  166.88 281.43 90 bottom
K109  G6K-2P-Y5VDC-A  [RL_OMRONG6K2PY_5V]  166.88 293.62 90 bottom
K110  G6K-2P-Y5VDC-A  [RL_OMRONG6K2PY_5V]  176.53 293.62 90 bottom
K111  G6K-2P-Y5VDC-A  [RL_OMRONG6K2PY_5V]  186.18 293.62 90 bottom
K112  G6K-2P-Y5VDC-A  [RL_OMRONG6K2PY_5V]  195.83 293.62 90 bottom
K113  MFS-E1T05G-A  [RL_MFS-E1T-G_5V]  245.11 221.36 0 bottom
LDB1  LDG-2-S8  [LED_0805]  40.96 298.45 0 top
LOGO1  LOGO_SR_SigmaStar  [LOGO_SR_SIGMASTAR]  29.16 434.98 0 top
LOGO2  -  [LOGO_KT_KSMT]  81.21 434.37 0 top
LRB1  330-1-S6  [R0603]  42.89 298.45 180 bottom
MBD1  BD120-1.5A-S4-MU  [FB0402]  222.95 290.49 270 bottom
MK1  AQY221R2MY-V2  [RL_AQY221R2MY_5V_V2]  225.87 284.52 180 bottom
MK2  AQY221R2MY-V2  [RL_AQY221R2MY_5V_V2]  225.87 289.86 180 bottom
MK3  AQY221R2MY-V2  [RL_AQY221R2MY_5V_V2]  225.87 281.98 180 bottom
MK4  AQY221R2MY-V2  [RL_AQY221R2MY_5V_V2]  225.87 287.19 180 bottom
MR1  1M-1-S4  [R0402_UNBGA_V2]  236.22 282.67 270 bottom
MR2  1K-0.01-S4  [R0402_UNBGA_V2]  235.91 293.54 180 bottom
MR3  1K-0.01-S4  [R0402_UNBGA_V2]  233.82 294.56 180 bottom
MR4  1K-0.01-S4  [R0402_UNBGA_V2]  233.82 295.57 180 bottom
MR5  1K-0.01-S4  [R0402_UNBGA_V2]  235.91 295.57 0 bottom
MR6  1K-0.01-S4  [R0402_UNBGA_V2]  235.91 294.56 0 bottom
MR7  332K-1-S4  [R0402_UNBGA_V2]  235.21 281.82 90 bottom
MR8  1K-0.01-S4  [R0402_UNBGA_V2]  224.35 295.57 180 bottom
MR9  499-0.1-S4  [R0402]  224.35 294.46 180 bottom
MR10  0-5-S4  [R0402]  224.35 293.34 0 bottom
MR11  750-1-S4  [R0402]  229.3 285.16 180 bottom
MR12  360-1-S6  [R0603]  229.68 283.89 180 bottom
MR13  750-1-S4  [R0402]  229.3 290.49 180 bottom
MR14  1.2K-1-S4  [R0402]  229.05 282.62 0 bottom
MR15  360-1-S6  [R0603]  229.68 289.22 180 bottom
MR16  750-1-S4  [R0402]  229.3 287.83 180 bottom
MR17  360-1-S6  [R0603]  229.68 286.56 180 bottom
MR18  11K-0.1-S4  [R0402]  221.81 287.06 270 bottom
MR19  1K-0.01-S4  [R0402_UNBGA_V2]  222.95 287.06 90 bottom
MU1  KSMT002-0.15A-A-SC70-5  [SC70_5P]  233.15 283.82 90 bottom
MU2  KSMT004-SO8  [SO8_244X127MM]  238.06 288.21 90 bottom
MU3  KSMT003-MSOP8  [SO8_172X0P65MM]  228.92 293.67 180 bottom
MU4  MAX6070AAUT30+T-SOT23  [SOT23_6P_0P95X2P7MM_H1P45MM]  220.67 290.49 0 bottom
NOREF  -  []  303.09 173.82 0 top
NOREF#2  -  []  350.54 180.4 0 top
NOREF#3  -  []  351.84 244.96 0 top
NOREF#4  -  []  543.62 170.72 90 top
NOREF#5  -  []  235.44 194.76 90 top
NOREF#6  -  []  307.93 247.56 0 top
NOREF#7  -  []  300.66 226.14 0 top
NOREF#8  -  []  266.91 144.24 0 top
NOREF#9  -  []  346.94 264.26 0 top
NOREF#10  -  []  261.62 293.19 90 top
NOREF#11  -  []  294.31 242 90 top
NOREF#12  -  []  224.52 290.49 0 top
NOREF#13  -  []  323.83 158.13 90 top
NOREF#14  -  []  323.45 271.37 0 top
NOREF#15  -  []  98.19 154.45 0 top
NOREF#16  -  []  57.64 254.33 90 top
NOREF#17  -  []  334.68 253.86 90 top
NOREF#18  -  []  308.26 162.94 90 top
NOREF#19  -  []  553.49 147.59 90 top
NOREF#20  -  []  102.08 170.11 90 top
NOREF#21  -  []  230.24 245.28 0 top
NOREF#22  -  []  367.88 212.03 90 top
NOREF#23  -  []  520.71 146.13 90 top
NOREF#24  -  []  314.91 163.58 0 top
NOREF#25  -  []  90.64 158.1 0 top
NOREF#26  -  []  271.84 246.26 0 top
NOREF#27  -  []  335.38 182.3 90 top
NOREF#28  -  []  226.94 178.18 0 top
NOREF#29  -  []  303.09 234.38 0 top
NOREF#30  -  []  309.59 185.29 90 top
NOREF#31  -  []  254.31 242 90 top
NOREF#32  -  []  311.48 241.42 90 top
NOREF#33  -  []  351.48 180.02 0 top
NOREF#34  -  []  567.63 170.72 90 top
NOREF#35  -  []  469.35 183 90 top
NOREF#36  -  []  95.99 217.95 0 top
NOREF#37  -  []  311.19 209.1 90 top
NOREF#38  -  []  334.66 192.79 0 top
NOREF#39  -  []  109.42 197.22 90 top
NOREF#40  -  []  78.8 291.62 0 top
NOREF#41  -  []  541.25 147.59 90 top
NOREF#42  -  []  214.68 243.61 0 top
NOREF#43  -  []  286.56 293.46 90 top
NOREF#44  -  []  334.68 243.61 0 top
NOREF#45  -  []  215.06 254.76 0 top
NOREF#46  -  []  272.14 251.08 0 top
NOREF#47  -  []  214.66 241.23 0 top
NOREF#48  -  []  308.25 174.12 90 top
NOREF#49  -  []  332.33 242.3 90 top
NOREF#50  -  []  303.27 174.06 0 top
NOREF#51  -  []  473.7 188.2 0 top
NOREF#52  -  []  226.61 190.18 90 top
NOREF#53  -  []  245.58 273.87 90 top
NOREF#54  -  []  332.45 238.82 0 top
NOREF#55  -  []  349.23 181.06 0 top
NOREF#56  -  []  230.24 184.64 90 top
NOREF#57  -  []  252.33 242.3 90 top
NOREF#58  -  []  311.08 269.73 0 top
NOREF#59  -  []  88.89 188.2 0 top
NOREF#60  -  []  228.57 244.96 0 top
NOREF#61  -  []  310.57 208.63 90 top
NOREF#62  -  []  315.38 249.88 90 top
NOREF#63  -  []  114.29 148.85 0 top
NOREF#64  -  []  360.81 158.16 0 top
NOREF#65  -  []  339.41 226.69 0 top
NOREF#66  -  []  87.69 249.7 0 top
NOREF#67  -  []  367.07 208.22 90 top
NOREF#68  -  []  286.56 297.26 90 top
NOREF#69  -  []  227.64 181.38 0 top
NOREF#70  -  []  232.23 167.99 90 top
NOREF#71  -  []  364.79 211.56 90 top
NOREF#72  -  []  331.83 230.23 315 top
NOREF#73  -  []  307.64 240.73 90 top
NOREF#74  -  []  362.57 220.09 0 top
NOREF#75  -  []  267.05 133.3 0 top
NOREF#76  -  []  234.91 163.58 0 top
NOREF#77  -  []  104.54 217.95 0 top
NOREF#78  -  []  355.48 293.54 0 top
NOREF#79  -  []  84.1 265.34 0 top
NOREF#80  -  []  232.13 183.41 90 top
NOREF#81  -  []  457.6 249.7 0 top
NOREF#82  -  []  281.34 136.1 0 top
NOREF#83  -  []  456.64 232.66 0 top
NOREF#84  -  []  263.92 295.57 0 top
NOREF#85  -  []  353.45 183.33 0 top
NOREF#86  -  []  459.07 130.61 0 top
NOREF#87  -  []  277.95 143.53 90 top
NOREF#88  -  []  276.29 269.73 0 top
NOREF#89  -  []  65.94 247.71 0 top
NOREF#90  -  []  317.14 138.77 90 top
NOREF#91  -  []  95.24 180.6 0 top
NOREF#92  -  []  340.66 226.14 0 top
NOREF#93  -  []  211.83 263.63 0 top
NOREF#94  -  []  273.99 208.8 90 top
NOREF#95  -  []  292.01 243.2 0 top
NOREF#96  -  []  211.33 267.13 0 top
NOREF#97  -  []  482.05 183 90 top
NOREF#98  -  []  474.25 189.85 0 top
NOREF#99  -  []  482.51 133.82 90 top
NOREF#100  -  []  480.05 188.2 0 top
NOREF#101  -  []  322.56 269.73 0 top
NOREF#102  -  []  116.29 151.25 90 top
NOREF#103  -  []  275.12 295.18 0 top
NOREF#104  -  []  350.18 183.37 0 top
NOREF#105  -  []  268.23 178.18 0 top
NOREF#106  -  []  228.23 242.08 90 top
NOREF#107  -  []  350.18 238.82 0 top
NOREF#108  -  []  293.54 179.12 90 top
NOREF#109  -  []  300.66 166.14 0 top
NOREF#110  -  []  348.57 185.61 0 top
NOREF#111  -  []  265.96 248.85 0 top
NOREF#112  -  []  464.85 278.68 0 top
NOREF#113  -  []  343.71 291.06 0 top
NOREF#114  -  []  233.34 270 0 top
NOREF#115  -  []  351.48 240.02 0 top
NOREF#116  -  []  315.12 294.17 90 top
NOREF#117  -  []  467.84 236.15 90 top
NOREF#118  -  []  308.23 238.18 0 top
NOREF#119  -  []  229.59 246.58 90 top
NOREF#120  -  []  107.94 212.35 0 top
NOREF#121  -  []  312.14 240.12 90 top
NOREF#122  -  []  210.56 175.55 90 top
NOREF#123  -  []  272.45 183.7 90 top
NOREF#124  -  []  283.15 271.05 0 top
NOREF#125  -  []  265.14 295.18 90 top
NOREF#126  -  []  227.75 235.77 0 top
NOREF#127  -  []  231.48 185.96 90 top
NOREF#128  -  []  352.23 232.39 90 top
NOREF#129  -  []  65.76 265.88 0 top
NOREF#130  -  []  275.06 190.18 90 top
NOREF#131  -  []  474.41 227.5 0 top
NOREF#132  -  []  318.33 268.22 90 top
NOREF#133  -  []  215.16 179.65 90 top
NOREF#134  -  []  223.71 285.73 0 top
NOREF#135  -  []  355.44 254.76 90 top
NOREF#136  -  []  362.56 269.25 90 top
NOREF#137  -  []  97.24 151.25 90 top
NOREF#138  -  []  243.83 218.13 90 top
NOREF#139  -  []  546.66 208.27 0 top
NOREF#140  -  []  546.66 211.06 0 top
NOREF#141  -  []  228.27 184.64 90 top
NOREF#142  -  []  210.61 187.17 90 top
NOREF#143  -  []  344.52 285.16 0 top
NOREF#144  -  []  265.05 145.8 0 top
NOREF#145  -  []  212.01 183.2 0 top
NOREF#146  -  []  286.89 291.24 90 top
NOREF#147  -  []  217.83 271.13 0 top
NOREF#148  -  []  340.66 226.14 0 top
NOREF#149  -  []  350.89 182.68 90 top
NOREF#150  -  []  273.34 270 0 top
NOREF#151  -  []  242.56 269.25 90 top
NOREF#152  -  []  311.84 186.26 0 top
NOREF#153  -  []  80 264.19 90 top
NOREF#154  -  []  231.16 179.12 90 top
NOREF#155  -  []  214.38 183.29 0 top
NOREF#156  -  []  362.91 267.92 0 top
NOREF#157  -  []  273.17 291.16 0 top
NOREF#158  -  []  348.25 233.12 90 top
NOREF#159  -  []  230.13 208.11 90 top
NOREF#160  -  []  560.13 170.72 90 top
NOREF#161  -  []  228.93 180.74 90 top
NOREF#162  -  []  309.85 179.12 90 top
NOREF#163  -  []  347.25 238.48 90 top
NOREF#164  -  []  213.29 242.3 90 top
NOREF#165  -  []  282.91 207.92 0 top
NOREF#166  -  []  231.84 244.96 0 top
NOREF#167  -  []  327.65 160.09 90 top
NOREF#168  -  []  543.62 154.21 90 top
NOREF#169  -  []  227.75 175.77 0 top
NOREF#170  -  []  210.61 235.6 90 top
NOREF#171  -  []  255.01 253.56 90 top
NOREF#172  -  []  310.84 242.62 0 top
NOREF#173  -  []  271.16 181.72 90 top
NOREF#174  -  []  309.5 268.8 90 top
NOREF#175  -  []  310.54 180.4 0 top
NOREF#176  -  []  311.16 185.61 0 top
NOREF#177  -  []  311.16 241.72 90 top
NOREF#178  -  []  558.12 147.98 0 top
NOREF#179  -  []  501.52 204.14 90 top
NOREF#180  -  []  332.66 253.56 90 top
NOREF#181  -  []  325.73 213.87 90 top
NOREF#182  -  []  316.94 252.76 90 top
NOREF#183  -  []  90.88 138.68 90 top
NOREF#184  -  []  267.64 180.73 90 top
NOREF#185  -  []  255.56 180.9 90 top
NOREF#186  -  []  290.61 187.17 90 top
NOREF#187  -  []  343.27 174.06 0 top
NOREF#188  -  []  241.13 207.92 90 top
NOREF#189  -  []  83.8 290.99 90 top
NOREF#190  -  []  96.99 253.35 0 top
NOREF#191  -  []  295.56 192.47 90 top
NOREF#192  -  []  223.71 280.78 90 top
NOREF#193  -  []  286.24 295.03 0 top
NOREF#194  -  []  228.01 173.3 90 top
NOREF#195  -  []  219.41 161.54 90 top
NOREF#196  -  []  233.63 146.07 0 top
NOREF#197  -  []  343.71 280.78 90 top
NOREF#198  -  []  270.84 242.62 0 top
NOREF#199  -  []  231.48 249.88 90 top
NOREF#200  -  []  37.68 268.47 0 top
NOREF#201  -  []  294.36 194.76 0 top
NOREF#202  -  []  539.84 220.37 0 top
NOREF#203  -  []  363.15 271.05 0 top
NOREF#204  -  []  80 290.36 90 top
NOREF#205  -  []  347.25 234.3 90 top
NOREF#206  -  []  364.38 213.87 0 top
NOREF#207  -  []  233.99 268.8 90 top
NOREF#208  -  []  271.11 293.99 90 top
NOREF#209  -  []  80 276.65 90 top
NOREF#210  -  []  350.83 184.63 90 top
NOREF#211  -  []  486.95 221.6 0 top
NOREF#212  -  []  121.88 173.3 0 top
NOREF#213  -  []  231.48 189.88 90 top
NOREF#214  -  []  114.84 221.6 0 top
NOREF#215  -  []  268.23 238.18 0 top
NOREF#216  -  []  456.55 241.07 0 top
NOREF#217  -  []  266.61 179.76 90 top
NOREF#218  -  []  293.39 195.18 0 top
NOREF#219  -  []  343.27 234.06 0 top
NOREF#220  -  []  463 183 90 top
NOREF#221  -  []  311.81 179.12 90 top
NOREF#222  -  []  312.23 167.99 0 top
NOREF#223  -  []  333.29 182.3 90 top
NOREF#224  -  []  267.27 186.26 0 top
NOREF#225  -  []  307.64 181.38 0 top
NOREF#226  -  []  84.1 276.15 0 top
NOREF#227  -  []  251.96 242 90 top
NOREF#228  -  []  335.16 239.65 90 top
NOREF#229  -  []  475.18 197.22 90 top
NOREF#230  -  []  361.34 136.1 0 top
NOREF#231  -  []  352.74 184.64 90 top
NOREF#232  -  []  312.13 243.4 0 top
NOREF#233  -  []  276.24 417.57 90 top
NOREF#234  -  []  281.13 207.92 90 top
NOREF#235  -  []  236.29 209.25 90 top
NOREF#236  -  []  339.42 293.48 0 top
NOREF#237  -  []  311.21 247.56 0 top
NOREF#238  -  []  307.27 246.26 0 top
NOREF#239  -  []  347.64 182.03 0 top
NOREF#240  -  []  362.56 209.25 90 top
NOREF#241  -  []  80.47 265.74 0 top
NOREF#242  -  []  252.45 190.39 0 top
NOREF#243  -  []  272.14 182.07 0 top
NOREF#244  -  []  285.1 268.22 0 top
NOREF#245  -  []  331.64 183.61 0 top
NOREF#246  -  []  303.09 233.82 0 top
NOREF#247  -  []  313.76 243.65 0 top
NOREF#248  -  []  292.78 190.69 90 top
NOREF#249  -  []  309.15 270.03 90 top
NOREF#250  -  []  310.84 243.37 0 top
NOREF#251  -  []  356.97 268.22 90 top
NOREF#252  -  []  238.32 142.99 0 top
NOREF#253  -  []  277.95 146.07 90 top
NOREF#254  -  []  369.83 203.63 90 top
NOREF#255  -  []  333.09 243.93 0 top
NOREF#256  -  []  312.14 182.07 0 top
NOREF#257  -  []  82.01 260.74 90 top
NOREF#258  -  []  294.68 182.3 90 top
NOREF#259  -  []  274.82 281.03 0 top
NOREF#260  -  []  292.33 193.86 90 top
NOREF#261  -  []  276.89 133.69 0 top
NOREF#262  -  []  315.12 295.18 0 top
NOREF#263  -  []  311.54 245.93 90 top
NOREF#264  -  []  229.53 184.02 0 top
NOREF#265  -  []  331.64 243.61 0 top
NOREF#266  -  []  263.95 232.9 90 top
NOREF#267  -  []  243.45 211.37 0 top
NOREF#268  -  []  84.29 189.85 0 top
NOREF#269  -  []  328.21 211.73 90 top
NOREF#270  -  []  350.86 185.29 0 top
NOREF#271  -  []  263.71 280.78 90 top
NOREF#272  -  []  267.77 174.98 0 top
NOREF#273  -  []  333.22 180.02 0 top
NOREF#274  -  []  122.64 151.25 90 top
NOREF#275  -  []  79.1 278.23 0 top
NOREF#276  -  []  276.97 208.22 90 top
NOREF#277  -  []  211.16 236.15 90 top
NOREF#278  -  []  310.55 134.62 90 top
NOREF#279  -  []  468.1 154.45 0 top
NOREF#280  -  []  340.66 166.14 0 top
NOREF#281  -  []  223.95 174.94 90 top
NOREF#282  -  []  313.03 294.95 0 top
NOREF#283  -  []  276.37 207.56 0 top
NOREF#284  -  []  252.33 253.86 90 top
NOREF#285  -  []  335.56 192.47 90 top
NOREF#286  -  []  235.44 194.76 90 top
NOREF#287  -  []  304.52 283.89 90 top
NOREF#288  -  []  232.13 189.88 90 top
NOREF#289  -  []  0 429.26 0 top
NOREF#290  -  []  352.78 251.08 0 top
NOREF#291  -  []  467.9 253.35 0 top
NOREF#292  -  []  264.09 231.46 0 top
NOREF#293  -  []  352.23 227.99 0 top
NOREF#294  -  []  90.88 200.91 90 top
NOREF#295  -  []  263.09 174.94 0 top
NOREF#296  -  []  228.66 226.14 0 top
NOREF#297  -  []  116.75 133.82 90 top
NOREF#298  -  []  346.92 249.88 90 top
NOREF#299  -  []  349.83 269.1 90 top
NOREF#300  -  []  276.65 207.92 0 top
NOREF#301  -  []  355.98 182.68 90 top
NOREF#302  -  []  286.03 214.19 0 top
NOREF#303  -  []  547.04 225.79 0 top
NOREF#304  -  []  303.27 173.14 0 top
NOREF#305  -  []  241.52 238.62 0 top
NOREF#306  -  []  233.11 183.7 90 top
NOREF#307  -  []  102.08 205.05 0 top
NOREF#308  -  []  243.37 213.06 90 top
NOREF#309  -  []  312.78 183.41 90 top
NOREF#310  -  []  333.22 250.39 90 top
NOREF#311  -  []  232.14 182.07 90 top
NOREF#312  -  []  40.05 272.89 0 top
NOREF#313  -  []  286.24 293.16 90 top
NOREF#314  -  []  480.8 217.95 0 top
NOREF#315  -  []  230.19 238.82 0 top
NOREF#316  -  []  459.8 217.95 0 top
NOREF#317  -  []  325.9 272.03 0 top
NOREF#318  -  []  348.93 180.73 0 top
NOREF#319  -  []  101.59 148.85 0 top
NOREF#320  -  []  313.46 243.33 0 top
NOREF#321  -  []  273.46 183.33 0 top
NOREF#322  -  []  263.27 235.18 0 top
NOREF#323  -  []  228.27 245.28 0 top
NOREF#324  -  []  351.48 185.96 90 top
NOREF#325  -  []  268.66 226.14 0 top
NOREF#326  -  []  311.16 243.67 90 top
NOREF#327  -  []  293.1 178.82 90 top
NOREF#328  -  []  272.74 244.64 90 top
NOREF#329  -  []  311.16 245.61 0 top
NOREF#330  -  []  215.56 180.9 90 top
NOREF#331  -  []  262.63 289.44 0 top
NOREF#332  -  []  232.14 180.12 90 top
NOREF#333  -  []  227.63 187.88 0 top
NOREF#334  -  []  275.38 249.88 90 top
NOREF#335  -  []  228.93 268.11 0 top
NOREF#336  -  []  230.57 268.63 0 top
NOREF#337  -  []  462.75 253.35 0 top
NOREF#338  -  []  293.22 190.39 90 top
NOREF#339  -  []  292.45 238.82 0 top
NOREF#340  -  []  309.5 208.8 90 top
NOREF#341  -  []  212.66 193.56 90 top
NOREF#342  -  []  332.33 193.86 90 top
NOREF#343  -  []  89.64 154.45 0 top
NOREF#344  -  []  370.33 162.13 90 top
NOREF#345  -  []  346.93 178.18 90 top
NOREF#346  -  []  534.23 205.35 0 top
NOREF#347  -  []  350.86 245.29 0 top
NOREF#348  -  []  271.11 292.69 90 top
NOREF#349  -  []  348.27 245.93 0 top
NOREF#350  -  []  235.08 243 0 top
NOREF#351  -  []  327.56 272.93 0 top
NOREF#352  -  []  212.13 13.07 0 top
NOREF#353  -  []  271.16 241.72 90 top
NOREF#354  -  []  271.48 191.08 0 top
NOREF#355  -  []  335.06 194.76 0 top
NOREF#356  -  []  291.83 170.23 315 top
NOREF#357  -  []  232.23 170.19 90 top
NOREF#358  -  []  253.99 242.3 90 top
NOREF#359  -  []  130.05 284.16 90 top
NOREF#360  -  []  215.01 242 90 top
NOREF#361  -  []  347.25 174.3 90 top
NOREF#362  -  []  346.28 191.08 0 top
NOREF#363  -  []  114.84 158.1 0 top
NOREF#364  -  []  351.15 179.12 90 top
NOREF#365  -  []  278.83 208.22 0 top
NOREF#366  -  []  277.14 138.77 90 top
NOREF#367  -  []  478.68 239.12 0 top
NOREF#368  -  []  463 246.5 90 top
NOREF#369  -  []  223.27 234.06 0 top
NOREF#370  -  []  90.79 145.82 0 top
NOREF#371  -  []  42.06 297.73 90 top
NOREF#372  -  []  270.84 243.37 90 top
NOREF#373  -  []  240.04 135.47 90 top
NOREF#374  -  []  39.68 273.28 0 top
NOREF#375  -  []  476.65 249.7 0 top
NOREF#376  -  []  264.52 290.49 0 top
NOREF#377  -  []  268.57 184.96 0 top
NOREF#378  -  []  350.5 250.18 90 top
NOREF#379  -  []  345.06 166.14 0 top
NOREF#380  -  []  272.2 283.17 90 top
NOREF#381  -  []  268.27 185.93 0 top
NOREF#382  -  []  102.38 141.22 0 top
NOREF#383  -  []  88.89 148.85 0 top
NOREF#384  -  []  275.21 281.4 90 top
NOREF#385  -  []  349.46 145.44 90 top
NOREF#386  -  []  311.54 186.58 0 top
NOREF#387  -  []  317.27 207.24 90 top
NOREF#388  -  []  467.84 233.61 90 top
NOREF#389  -  []  229.89 246.91 0 top
NOREF#390  -  []  271.47 249.88 90 top
NOREF#391  -  []  271.81 241.72 90 top
NOREF#392  -  []  355.21 281.4 90 top
NOREF#393  -  []  309.23 240.41 0 top
NOREF#394  -  []  82.32 289.93 90 top
NOREF#395  -  []  360.81 218.66 90 top
NOREF#396  -  []  214.66 192.79 0 top
NOREF#397  -  []  264.41 171.76 90 top
NOREF#398  -  []  225.48 235.27 0 top
NOREF#399  -  []  323.55 273.3 0 top
NOREF#400  -  []  292.78 179.12 90 top
NOREF#401  -  []  352.78 183.41 90 top
NOREF#402  -  []  259.42 292.84 90 top
NOREF#403  -  []  272.46 241.7 0 top
NOREF#404  -  []  363.72 211.73 90 top
NOREF#405  -  []  539.84 233.03 90 top
NOREF#406  -  []  461.75 217.95 0 top
NOREF#407  -  []  303.56 295.96 0 top
NOREF#408  -  []  232.46 242.37 90 top
NOREF#409  -  []  334.36 254.76 0 top
NOREF#410  -  []  351.15 239.12 90 top
NOREF#411  -  []  233.63 143.53 0 top
NOREF#412  -  []  466.15 154.45 0 top
NOREF#413  -  []  244.68 214.19 0 top
NOREF#414  -  []  355.12 293.93 0 top
NOREF#415  -  []  352.45 190.18 90 top
NOREF#416  -  []  253.22 180.02 0 top
NOREF#417  -  []  211.83 225.63 90 top
NOREF#418  -  []  473.7 212.35 0 top
NOREF#419  -  []  343.27 235.18 0 top
NOREF#420  -  []  350.18 242.62 0 top
NOREF#421  -  []  90.79 209.32 0 top
NOREF#422  -  []  242.74 209.49 0 top
NOREF#423  -  []  227.26 238.48 90 top
NOREF#424  -  []  276.07 207.24 0 top
NOREF#425  -  []  309.23 208.44 0 top
NOREF#426  -  []  282.34 267.24 0 top
NOREF#427  -  []  55.64 250.3 0 top
NOREF#428  -  []  474.45 249.7 0 top
NOREF#429  -  []  343.27 175.18 0 top
NOREF#430  -  []  335.16 191.22 90 top
NOREF#431  -  []  353.63 146.07 0 top
NOREF#432  -  []  230.18 242.62 0 top
NOREF#433  -  []  461 212.35 0 top
NOREF#434  -  []  273.63 146.07 0 top
NOREF#435  -  []  303.71 283.19 0 top
NOREF#436  -  []  224.52 286.56 90 top
NOREF#437  -  []  268.93 268.11 0 top
NOREF#438  -  []  349.59 187.23 0 top
NOREF#439  -  []  546.96 209.34 0 top
NOREF#440  -  []  350.83 187.16 0 top
NOREF#441  -  []  273.11 243.7 90 top
NOREF#442  -  []  287.4 267.92 90 top
NOREF#443  -  []  272.16 181.38 0 top
NOREF#444  -  []  224.42 235.77 0 top
NOREF#445  -  []  230.18 191.08 0 top
NOREF#446  -  []  271.15 190.18 90 top
NOREF#447  -  []  313.63 143.53 0 top
NOREF#448  -  []  308.27 245.28 0 top
NOREF#449  -  []  345.83 145.8 90 top
NOREF#450  -  []  263.95 174.94 90 top
NOREF#451  -  []  95.99 249.7 0 top
NOREF#452  -  []  311.19 183 0 top
NOREF#453  -  []  469.35 214.75 90 top
NOREF#454  -  []  307.58 178.18 90 top
NOREF#455  -  []  302.96 225.63 90 top
NOREF#456  -  []  548.65 417.57 90 top
NOREF#457  -  []  340.67 289.14 0 top
NOREF#458  -  []  318.71 141.78 90 top
NOREF#459  -  []  268.23 238.18 90 top
NOREF#460  -  []  350.83 243.37 90 top
NOREF#461  -  []  317.71 267.75 0 top
NOREF#462  -  []  244.68 274.19 0 top
NOREF#463  -  []  235.6 281.03 90 top
NOREF#464  -  []  231.69 269.1 0 top
NOREF#465  -  []  244.05 212.03 90 top
NOREF#466  -  []  84.1 292.77 0 top
NOREF#467  -  []  234.91 163.58 90 top
NOREF#468  -  []  315.12 293.93 0 top
NOREF#469  -  []  312.06 245.29 90 top
NOREF#470  -  []  228.56 178.48 90 top
NOREF#471  -  []  308.93 180.09 90 top
NOREF#472  -  []  283.15 211.05 0 top
NOREF#473  -  []  271.44 240.08 90 top
NOREF#474  -  []  560.13 154.99 0 top
NOREF#475  -  []  332.78 239.12 90 top
NOREF#476  -  []  293.1 250.39 90 top
NOREF#477  -  []  271.81 179.12 90 top
NOREF#478  -  []  307.05 134.31 0 top
NOREF#479  -  []  285.9 212.03 0 top
NOREF#480  -  []  323.54 207.24 90 top
NOREF#481  -  []  467.35 188.2 0 top
NOREF#482  -  []  309.59 247.23 0 top
NOREF#483  -  []  255.16 251.22 90 top
NOREF#484  -  []  270.84 178.82 90 top
NOREF#485  -  []  313.4 295.57 0 top
NOREF#486  -  []  211.31 183.2 0 top
NOREF#487  -  []  307.63 247.88 0 top
NOREF#488  -  []  84.29 158.1 0 top
NOREF#489  -  []  269.5 268.8 90 top
NOREF#490  -  []  235.44 254.76 90 top
NOREF#491  -  []  344.41 171.76 90 top
NOREF#492  -  []  223.27 288.24 90 top
NOREF#493  -  []  295.56 252.47 90 top
NOREF#494  -  []  293.61 242 90 top
NOREF#495  -  []  332.01 243.2 0 top
NOREF#496  -  []  293.1 238.82 90 top
NOREF#497  -  []  286.75 209.12 0 top
